# Altium PCB Control Board-v1.0.PcbDoc (part 8 of 8)
Units mil, origin at the board's own origin, x right, y up, seen from the top; angles counter-clockwise.
Board outline 7874.02 x 5118.11 mil, 4 copper layers (Top Layer, Layer 1, Layer 2, Bottom Layer), stack 61.654 mil thick; 475 components, 366 nets, 1579 pads, 587 vias.
Unrouted connection lines stored in the file: 427.
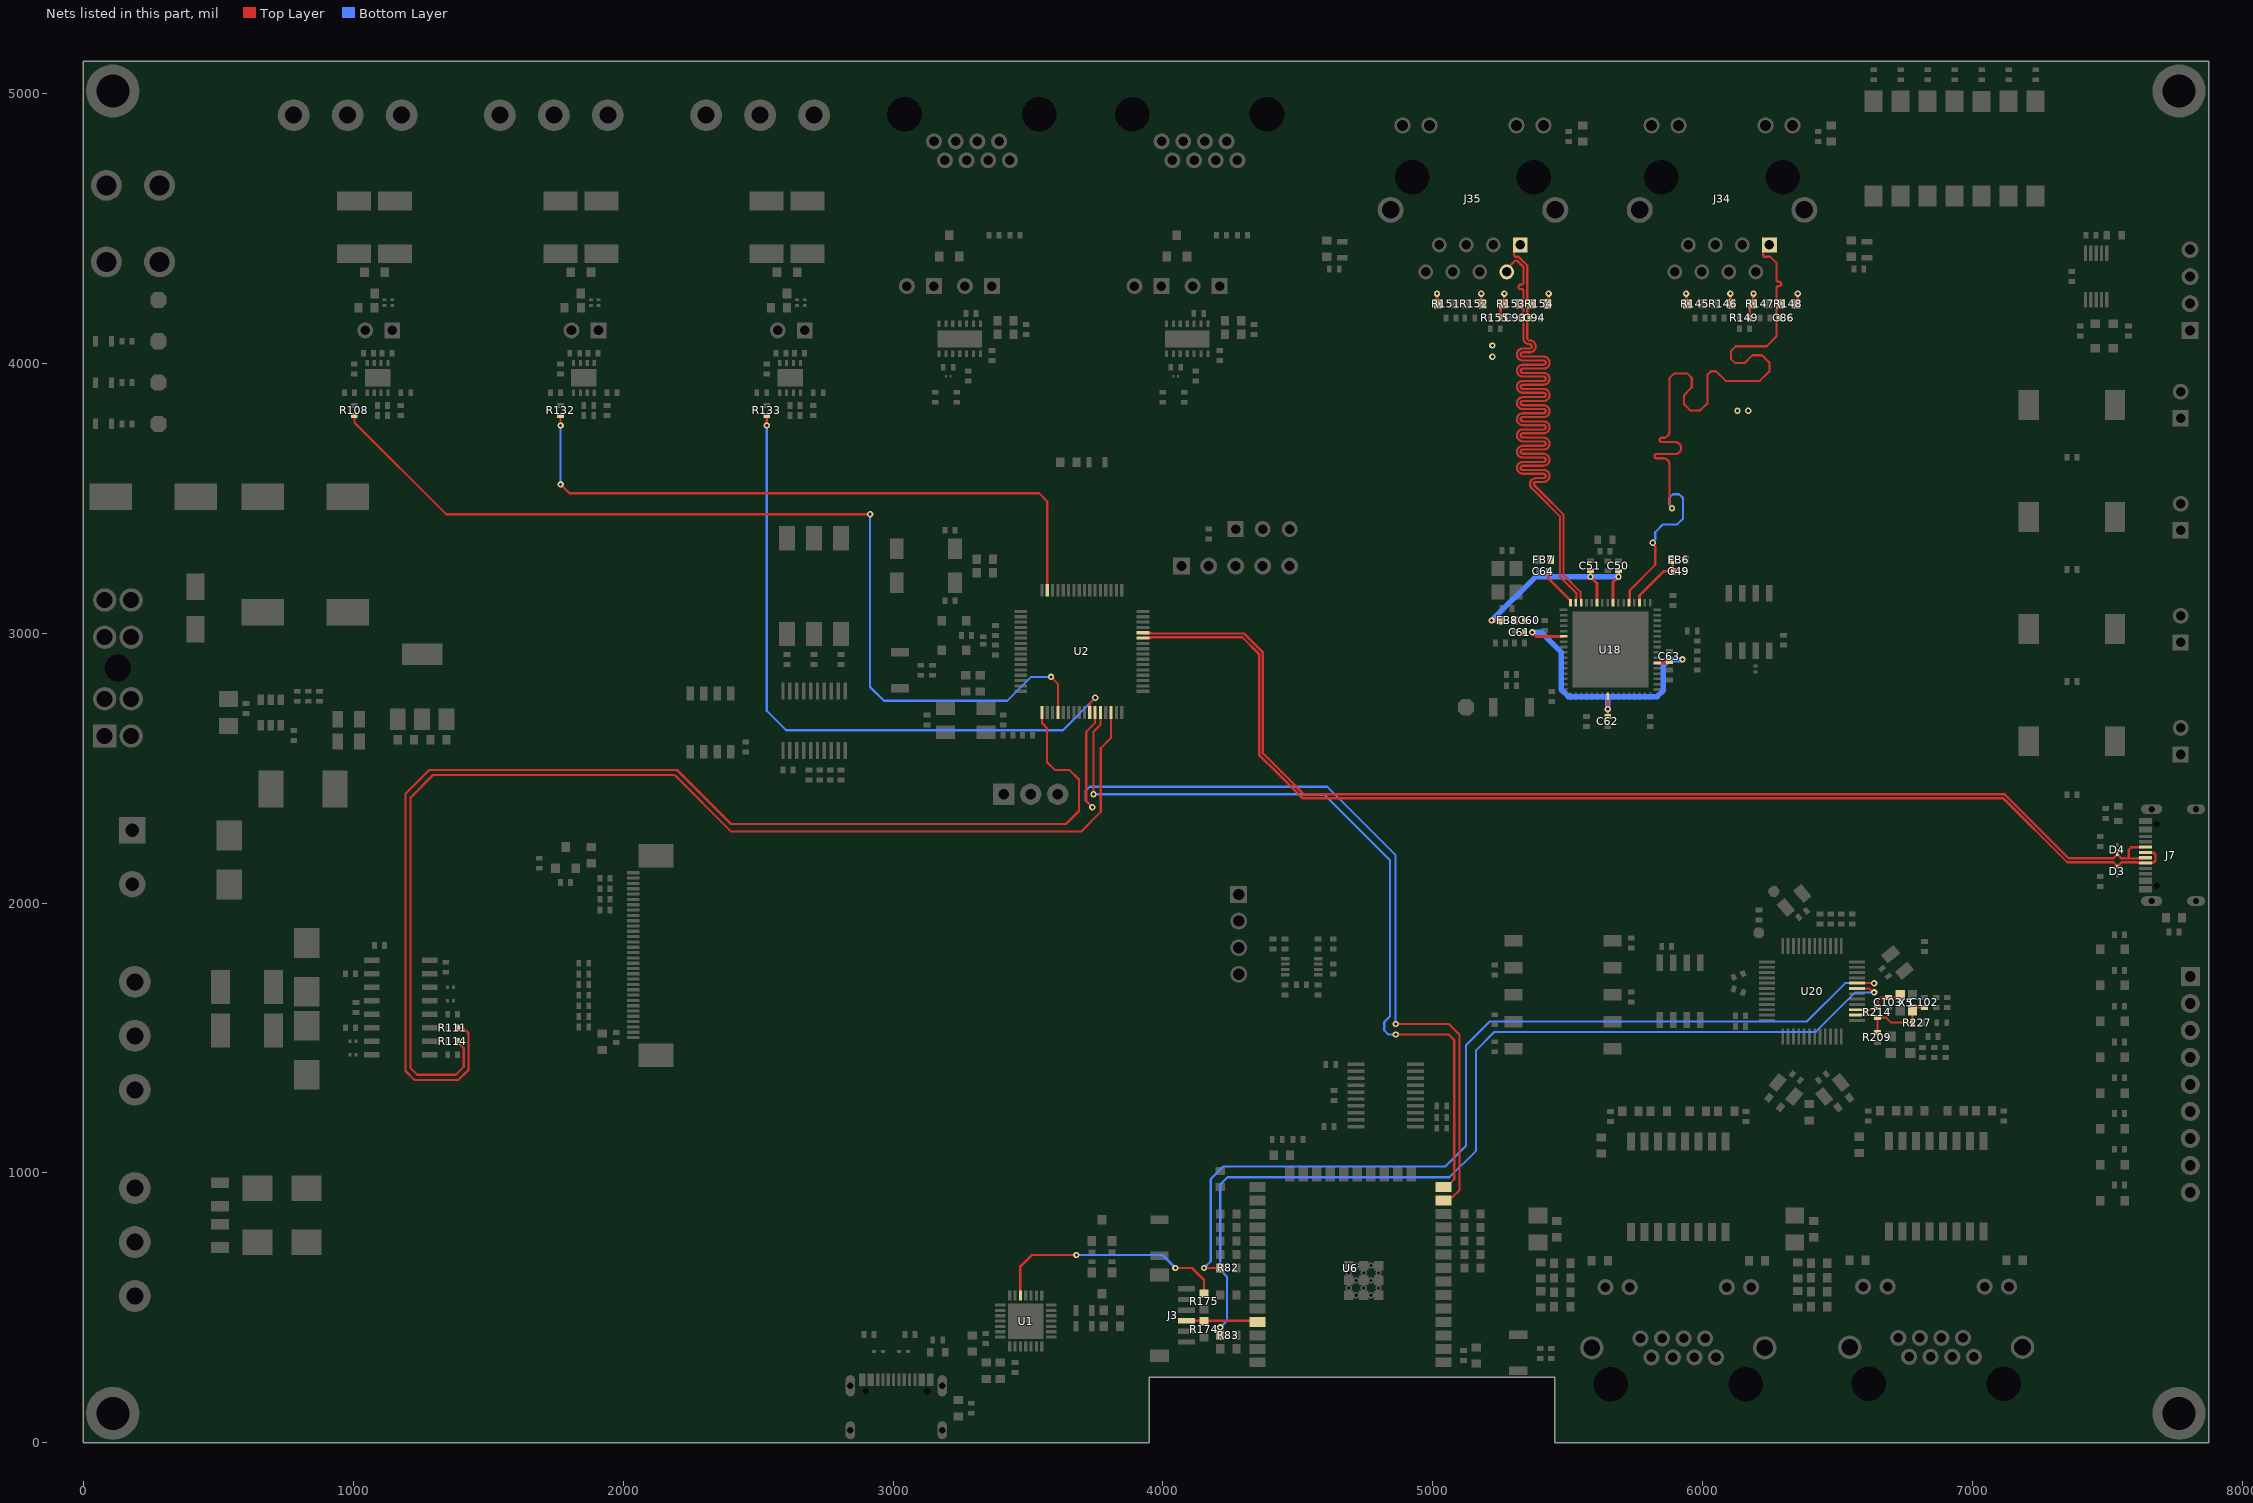
[diagram p7: the nets of this part, all layers, seen from the top]

## Via types
v1: diameter 23.62, hole 11.81, Top Layer to Bottom Layer, 587 vias

## Nets (pads, with @x,y where several pads share a name; then routed paths per layer and width w, separated by ;. In a path a pad name is that pad's centre, name@x,y a point inside that pad or via, vN(x,y) a via of type N, cw(c..) or ccw(c..) an arc to the next point about the centre after c; other vN are vias at no path point) (continued)
TXA_P: C86.2 J34.1 R148.1 U18.53 | length 2854.4
  Top Layer w8: U18.53@5726.17,3111.83 5727.09,3112.75 5727.09,3128.74 5729.01,3130.66 5729.01,3158.11 5823.88,3252.98 5823.89,3322.26 5814.07,3332.07 v1(5814.07,3334.76) ; v1(5885.81,3462.65) 5885.81,3465.33 5876,3475.14 5876,3614.65 5876,3625.65 ccw(c5854,3625.65) 5854,3647.65 5828.35,3647.65 cw(c5828.35,3655.65) 5828.35,3663.65 5897.69,3663.65 ccw(c5897.69,3685.65) 5897.69,3707.65 5847.52,3707.65 cw(c5847.52,3715.65) 5847.52,3723.65 5854,3723.65 ccw(c5854,3745.65) 5876,3745.65 5876,3775.55 5876,3898.75 5876,3943.79 5894.42,3962.21 5942.19,3962.21 5959.1,3945.31 5959.1,3910.49 5930.31,3881.71 5930.31,3848 5934.42,3843.9 5953.2,3825.11 5990.8,3825.11 6017.33,3851.64 6017.33,3957.42 6030,3970.09 6049.04,3970.09 6084.6,3934.54 6211.13,3934.54 6246.69,3970.09 6246.69,4002.15 6219.38,4029.45 6183.6,4029.45 6154.26,4000.11 6120.52,4000.11 6103.75,4016.88 6103.75,4044.54 6122.07,4062.86 6236.55,4062.86 6272.32,4098.63 6272.32,4154.65 6281.82,4164.15 C86.2@6281.82,4167.65 6281.82,4171.15 6272.32,4180.65 6272.32,4202.15 6287.32,4217.15 R148.1@6287.32,4219.65 6287.32,4222.15 6272.32,4237.15 6272.32,4257.65 6272.32,4277.65 cw(c6280.32,4277.65) 6280.32,4285.65 6282.78,4285.65 ccw(c6282.78,4293.65) 6282.78,4301.65 6280.32,4301.65 cw(c6280.32,4309.65) 6272.32,4309.65 6272.32,4338.19 6272.32,4372.48 6250.22,4394.58 6227.51,4394.58 6222.82,4399.26 6222.82,4414.67 J34.1@6246.34,4438.19
  Bottom Layer w8: v1(5814.07,3334.76) 5814.07,3337.44 5823.89,3347.25 5823.89,3374.11 5852.62,3402.85 5905.06,3402.85 5926.19,3423.97 5926.19,3500.35 5912.12,3514.41 5889.49,3514.41 5876,3500.93 5876,3475.14 5885.81,3465.33 v1(5885.81,3462.65)
TXB_N: C93.2 J35.2 R153.1 U18.63 | length 2974.7
  Top Layer w8: J35.2@5273.52,4338.19 5273.52,4349.41 5304.68,4380.58 5311.31,4380.58 5335.49,4356.39 5335.49,4318.73 5335.49,4298.73 cw(c5327.49,4298.73) 5327.49,4290.73 5324.73,4290.73 ccw(c5324.73,4282.73) 5324.73,4274.73 5327.49,4274.73 cw(c5327.49,4266.73) 5335.49,4266.73 5335.49,4247.4 5335.49,4237.15 5320.49,4222.15 R153.1@5320.49,4219.65 5320.49,4217.15 5335.49,4202.15 5335.49,4180.65 5325.99,4171.15 C93.2@5325.99,4167.65 5325.99,4164.15 5335.49,4154.65 5335.49,4154.41 5335.49,4092.29 ccw(c5357.49,4092.29) 5357.49,4070.29 5358.92,4070.29 cw(c5358.92,4062.29) 5366.92,4062.29 cw(c5358.92,4062.29) 5358.92,4054.29 5333.25,4054.29 ccw(c5333.25,4032.29) 5311.25,4032.29 ccw(c5333.25,4032.29) 5333.25,4010.29 5410.22,4010.29 cw(c5410.22,4002.29) 5418.22,4002.29 cw(c5410.22,4002.29) 5410.22,3994.29 5333.25,3994.29 ccw(c5333.25,3972.29) 5311.25,3972.29 ccw(c5333.25,3972.29) 5333.25,3950.29 5410.22,3950.29 cw(c5410.22,3942.29) 5418.22,3942.29 cw(c5410.22,3942.29) 5410.22,3934.29 5333.25,3934.29 ccw(c5333.25,3912.29) 5311.25,3912.29 ccw(c5333.25,3912.29) 5333.25,3890.29 5410.22,3890.29 cw(c5410.22,3882.29) 5418.22,3882.29 cw(c5410.22,3882.29) 5410.22,3874.29 5333.25,3874.29 ccw(c5333.25,3852.29) 5311.25,3852.29 ccw(c5333.25,3852.29) 5333.25,3830.29 5410.22,3830.29 cw(c5410.22,3822.29) 5418.22,3822.29 cw(c5410.22,3822.29) 5410.22,3814.29 5333.25,3814.29 ccw(c5333.25,3792.29) 5311.25,3792.29 ccw(c5333.25,3792.29) 5333.25,3770.29 5410.22,3770.29 cw(c5410.22,3762.3) 5418.22,3762.3 cw(c5410.22,3762.29) 5410.22,3754.3 5333.25,3754.3 ccw(c5333.25,3732.3) 5311.25,3732.3 ccw(c5333.25,3732.3) 5333.25,3710.3 5410.22,3710.3 cw(c5410.22,3702.3) 5418.22,3702.3 cw(c5410.22,3702.3) 5410.22,3694.3 5333.25,3694.3 ccw(c5333.25,3672.3) 5311.25,3672.3 ccw(c5333.25,3672.3) 5333.25,3650.3 5410.22,3650.3 cw(c5410.22,3642.3) 5418.22,3642.3 cw(c5410.22,3642.3) 5410.22,3634.3 5333.25,3634.3 ccw(c5333.25,3612.3) 5311.25,3612.3 ccw(c5333.25,3612.3) 5333.25,3590.3 5410.22,3590.3 cw(c5410.22,3582.3) 5418.22,3582.3 cw(c5410.22,3582.3) 5410.22,3574.3 5381.84,3574.3 ccw(c5381.84,3552.3) 5366.32,3536.7 5384.22,3518.8 5470.27,3432.75 5470.27,3209.72 5532.16,3147.83 5532.16,3130.66 5530.24,3128.74 5530.24,3112.75 U18.63@5529.32,3111.83
TXB_P: C94.2 J35.1 R154.1 U18.62 | length 2974.7
  Top Layer w8: J35.1@5323.52,4438.19 5300,4414.67 5300,4399.26 5304.68,4394.58 5317.11,4394.58 5349.49,4362.19 5349.49,4237.15 5364.49,4222.15 R154.1@5364.49,4219.65 5364.49,4217.15 5349.49,4202.15 5349.49,4180.65 5358.99,4171.15 C94.2@5358.99,4167.65 5358.99,4164.15 5349.49,4154.65 5349.49,4154.41 5349.49,4092.29 ccw(c5357.49,4092.29) 5357.49,4084.29 5358.92,4084.29 cw(c5358.92,4062.29) 5380.92,4062.29 cw(c5358.92,4062.29) 5358.92,4040.29 5333.25,4040.29 ccw(c5333.25,4032.29) 5325.25,4032.29 ccw(c5333.25,4032.29) 5333.25,4024.29 5410.22,4024.29 cw(c5410.22,4002.29) 5432.22,4002.29 cw(c5410.22,4002.29) 5410.22,3980.29 5333.25,3980.29 ccw(c5333.25,3972.29) 5325.25,3972.29 ccw(c5333.25,3972.29) 5333.25,3964.29 5410.22,3964.29 cw(c5410.22,3942.29) 5432.22,3942.29 cw(c5410.22,3942.29) 5410.22,3920.29 5333.25,3920.29 ccw(c5333.25,3912.29) 5325.25,3912.29 ccw(c5333.25,3912.29) 5333.25,3904.29 5410.22,3904.29 cw(c5410.22,3882.29) 5432.22,3882.29 cw(c5410.22,3882.29) 5410.22,3860.29 5333.25,3860.29 ccw(c5333.25,3852.29) 5325.25,3852.29 ccw(c5333.25,3852.29) 5333.25,3844.29 5410.22,3844.29 cw(c5410.22,3822.29) 5432.22,3822.29 cw(c5410.22,3822.29) 5410.22,3800.29 5333.25,3800.29 ccw(c5333.25,3792.29) 5325.25,3792.29 ccw(c5333.25,3792.29) 5333.25,3784.29 5410.22,3784.29 cw(c5410.22,3762.3) 5432.22,3762.3 cw(c5410.22,3762.29) 5410.22,3740.3 5333.25,3740.3 ccw(c5333.25,3732.3) 5325.25,3732.3 ccw(c5333.25,3732.3) 5333.25,3724.3 5410.22,3724.3 cw(c5410.22,3702.3) 5432.22,3702.3 cw(c5410.22,3702.3) 5410.22,3680.3 5333.25,3680.3 ccw(c5333.25,3672.3) 5325.25,3672.3 ccw(c5333.25,3672.3) 5333.25,3664.3 5410.22,3664.3 cw(c5410.22,3642.3) 5432.22,3642.3 cw(c5410.22,3642.3) 5410.22,3620.3 5333.25,3620.3 ccw(c5333.25,3612.3) 5325.25,3612.3 ccw(c5333.25,3612.3) 5333.25,3604.3 5410.22,3604.3 cw(c5410.22,3582.3) 5432.22,3582.3 cw(c5410.22,3582.3) 5410.22,3560.3 5381.84,3560.3 ccw(c5381.84,3552.3) 5376.18,3546.64 5404.02,3518.8 5484.27,3438.55 5484.27,3215.52 5546.16,3153.62 5546.16,3130.66 5548.08,3128.74 5548.08,3112.75 U18.62@5549.01,3111.83
TXD0: J3.3 R174.2 U6.35 | length 265.5
  Top Layer w10: J3.3@4086.23,452.64 4345.15,452.64 U6.35@4349.78,448
TXD/RS232: R114.2 U2.30 | length 4419.1
  Top Layer w8: R114.2@1387,1487.99 1387,1484.49 1409.68,1461.82 1409.68,1393.02 1380.4,1363.74 1237.33,1363.74 1212.67,1388.4 1212.67,2391.21 1295.83,2474.37 2191.01,2474.37 2400.91,2264.47 3696.12,2264.47 3769.39,2337.74 3769.39,2573.62 3807.54,2611.78 U2.30@3807.54,2706.04
TXD/RS232-2: R111.2 U2.17 | length 4562.1
  Top Layer w8: R111.2@1387,1537.99 1407.39,1537.99 1426.81,1518.57 1426.81,1381.36 1390.35,1344.89 1226.64,1344.89 1193.84,1377.69 1193.84,2405.36 1281.37,2492.89 2199.29,2492.89 2399.43,2292.75 3640.64,2292.75 3689.02,2341.14 3689.02,2457.5 3653.29,2493.24 3599.43,2493.24 3570.59,2522.08 3570.59,2647.75 3551.63,2666.71 U2.17@3551.63,2706.04
TXD/RS485: R108.1 U2.20 | length 3588.3
  Top Layer w8: R108.1@1004.2,3806.65 1004.2,3780.26 1344.09,3440.37 v1(2914.82,3440.37) ; v1(3585.1,2837.93) 3610.69,2812.34 U2.20@3610.69,2706.04
  Bottom Layer w8: v1(2914.82,3440.37) 2914.82,2800.61 2966.16,2749.27 3422.69,2749.27 3511.35,2837.93 v1(3585.1,2837.93)
TXD/RS485-2: R132.1 U2.63 | length 2413.9
  Top Layer w8: v1(1768.2,3551.11) 1801.4,3517.91 3541.19,3517.91 3571.32,3487.78 U2.63@3571.32,3158.79 ; v1(1768.2,3769.18) R132.1@1768.2,3806.65
  Bottom Layer w8: v1(1768.2,3551.11) v1(1768.2,3769.18)
TXD/RS485-3: R133.1 U2.26 | length 2453.2
  Top Layer w8: v1(2532.2,3769.18) R133.1@2532.2,3806.65 ; U2.26@3728.8,2706.04 3728.8,2739.86 v1(3749.34,2760.4)
  Bottom Layer w8: v1(2532.2,3769.18) 2532.2,2712.59 2604.43,2640.35 3629.3,2640.35 v1@3748.97,2760.03
TXD_0: R82.1 U20.20 | length 3439.2
  Top Layer w8: v1(4152,648) R82.1@4212,648 ; U20.20@6571.82,1703.21 v1(6634.54,1703.21)
  Bottom Layer w8: v1(4152,648) 4177.02,673.02 4177.02,977.97 4222.8,1023.74 5045.74,1023.74 5122.68,1100.68 5122.68,1473.18 5210.69,1561.19 6385.44,1561.19 6527.46,1703.21 v1(6634.54,1703.21)
TXD_1: R83.1 U20.19 | length 3583.8
  Top Layer w8: R83.1@4212,398 v1(4212,427.83) ; U20.19@6571.83,1683.52 6615.94,1683.52 6630.31,1669.16 v1(6634.54,1669.16)
  Bottom Layer w8: v1(4212,427.83) 4237,452.83 4237,616 4212,641 4212,957.3 4238.69,984 5061.01,984 5159.95,1082.94 5159.95,1454.59 5227.99,1522.62 6418.18,1522.62 6564.71,1669.16 v1(6634.54,1669.16)
TXD_CP2102: R175.1 U1.26 | length 893.2
  Top Layer w9: U1.26@3471.8,545.86 3471.8,653.81 3514.11,696.11 v1(3679.11,696.11) ; v1(4046,648) 4107,648 4152,603 R175.1@4152,554.01
  Bottom Layer w9: v1(3679.11,696.11) 3997.89,696.11 v1(4046,648)
USART5_RX: U2.28 U6.14 | length 3013.8
  Top Layer w8: v1(3742.35,2403.11) 3742.35,2634.37 3768.17,2660.19 U2.28@3768.17,2706.04 ; v1(4862,1513) 5058.45,1513 5079.11,1492.34 5079.11,976.54 5050.57,948 U6.14@5038.76,948 U6.14@5025.45,934.69
  Bottom Layer w8: v1(3742.35,2403.11) 4596.5,2403.11 4841,2158.61 4841,1580.79 4819.58,1559.37 4819.58,1528.52 4835.11,1513 v1(4862,1513)
USART5_TX: U2.27 U6.13 | length 3254.4
  Top Layer w8: v1(3738.39,2355.15) 3715.71,2377.82 3715.71,2634.8 3748.48,2667.57 U2.27@3748.48,2706.04 ; v1(4862,1552) 5058.45,1552 5098.47,1511.97 5098.47,936.29 5073.58,911.39 5052.15,911.39 U6.13@5038.76,898 U6.13@5025.46,911.3
  Bottom Layer w8: v1(3738.39,2355.15) 3712.37,2381.16 3712.37,2415.04 3728.28,2430.95 4608.66,2430.95 4862,2177.61 v1(4862,1552)
USB_N: D3.1 J7.A7 J7.B7 U2.43 | length 4396.7
  Top Layer w9: U2.43@3925.65,2981.63 3927.05,2983.03 3955.98,2983.03 3957.42,2984.47 3980.76,2984.47 4293.78,2984.47 4356.06,2922.2 4356.06,2548.95 4423.9,2481.12 4516.47,2388.54 7112.47,2388.54 7349.8,2151.21 7520.38,2151.21 7534.29,2137.3 7534.29,2135.52 D3.1@7535.11,2134.71 ; D3.1@7535.11,2136.48 7535.92,2137.3 7537.69,2137.3 7551.48,2151.09 7608.32,2151.09 7609.76,2149.65 7669.33,2149.65 7677,2157.32 7677,2179.93 7670.02,2186.91 7640.8,2186.91 J7.A7@7640.1,2187.61
USB_P: D4.1 J7.A6 J7.B6 U2.44 | length 4393.1
  Top Layer w9: U2.44@3925.65,3001.32 3927.05,2999.91 3955.98,2999.91 3957.42,2998.47 3986.55,2998.47 4299.58,2998.47 4370.06,2928 4370.06,2554.75 4437.9,2486.91 4522.27,2402.54 7118.27,2402.54 7355.6,2165.21 7520.38,2165.21 7534.29,2179.12 7534.29,2180.89 D4.1@7535.11,2181.71 ; D4.1@7535.11,2179.94 7535.92,2179.12 7537.69,2179.12 7551.61,2165.21 7562.88,2165.21 7563,2165.09 7577.94,2165.09 ; J7.A6@7640.1,2167.93 7638.69,2166.52 7609.76,2166.52 7608.32,2165.09 7577.94,2165.09 ; J7.B6@7640.1,2207.3 7587.99,2207.3 7577.94,2197.25 7577.94,2165.09
VDD12TX1: C50.2 C51.2 FB8.2 U18.56 U18.59 | length 823.2
  Top Layer w10: C51.2@5583.61,3230.83 v1(5583.61,3208.75) 5608.06,3184.3 U18.59@5608.06,3111.83 ; U18.56@5667.12,3111.83 5667.12,3188.38 v1(5687.49,3208.75) C50.2@5687.49,3230.83
  Top Layer w15: v1(5217.55,3046.87) FB8.2@5247.18,3046.87
  Bottom Layer w20: v1(5217.55,3046.87) 5379.43,3208.75 v1(5583.61,3208.75) v1(5687.49,3208.75)
VDD33TXRX1: C49.2 FB6.2 R145.2 R146.2 R147.2 R148.2 R149.2 U18.51 | length 429.1
  Top Layer w8: R149.2@6172.32,4167.65 6174.06,4169.39 6174.06,4210.39 R147.2@6183.32,4219.65
  Top Layer w10: U18.51@5765.54,3111.83 5765.54,3139.38 5855,3228.84 C49.2@5891.66,3228.84 5888.69,3231.81 5888.69,3265.63 FB6.2@5882.6,3271.72 ; R145.2@5938.12,4223.84 v1(5938.12,4257.65) ; R146.2@6102.15,4223.84 v1(6102.15,4257.65) ; R147.2@6187.52,4223.84 v1(6187.52,4257.65) ; R148.2@6351.52,4223.84 v1(6351.52,4257.65)
  other v1: 6128.17,3824.11 6168,3824.11
VDD33TXRX2: C64.2 FB7.2 R151.2 R152.2 R153.2 R154.2 R155.2 U18.64 | length 342.8
  Top Layer w8: R155.2@5249.49,4167.65 5251.23,4169.39 5251.23,4210.39 R153.2@5260.49,4219.65
  Top Layer w10: R151.2@5015.3,4223.84 v1(5015.3,4257.65) ; R152.2@5179.32,4223.84 v1(5179.32,4257.65) ; R153.2@5264.69,4223.84 v1(5264.69,4257.65) ; C64.2@5427.47,3228.84 5427.47,3202.7 5509.64,3120.53 U18.64@5509.64,3111.83 ; R154.2@5428.69,4223.84 v1(5428.69,4257.65)
  other v1: 5220.32,4023.65 5220.32,4065.65
VDDCR: C60.2 C61.2 C62.2 C63.2 FB8.1 U18.6 U18.24 U18.38 | length 1137.9
  Top Layer w10: v1(5368.05,3002.58) 5382.81,2987.81 U18.6@5484.05,2987.81 ; C62.2@5647.65,2691.69 5647.65,2718.56 U18.24@5647.65,2765.59 ; U18.38@5830.5,2889.39 5867.22,2889.39 5872.8,2894.97 C63.2@5876.3,2894.97
  Bottom Layer w20: v1(5368.05,3002.58) 5402.44,3002.58 5474.8,2930.22 5474.8,2791.83 5501.8,2764.83 5647.43,2764.83 ; v1(5647.43,2718.34) 5647.43,2764.83 ; v1(5924.8,2902.62) 5924.11,2901.93 5875.73,2901.93 5853.94,2880.14 5853.94,2788.14 5830.63,2764.83 5647.43,2764.83
X1: C102.2 R209.1 R214.1 R227.1 U20.14 X5.1 | length 366.4
  Top Layer w7: U20.14@6571.82,1585.1 6634.72,1585.1 6643.54,1576.28 R214.1@6647.04,1576.28 ; R209.1@6647.04,1521 R214.1@6647.04,1576.28 ; C102.2@6821.1,1613.28 6787,1613.28 X5.1@6776.63,1602.92 R227.1@6776.63,1557 6697.24,1557 6677.96,1576.28 R214.1@6647.04,1576.28
X2: C103.2 R214.2 U20.15 X5.3 | length 198
  Top Layer w7: U20.15@6571.83,1604.78 6635.03,1604.78 6643.54,1613.28 R214.2@6647.04,1613.28 6647.04,1639.95 6657.37,1650.28 C103.2@6687.53,1650.28 6721.64,1650.28 X5.3@6731.36,1660
pads on no net: J1.A8 J1.B8 J1.MH J3.MP1 J3.MP2 J7.A8 J7.B8 J7.MH J8.MH J14. J16.MH J18. J18.1 J18.2 J18.3 J18.6 J22. J22.1 J22.2 J22.3 J22.6 J24.11 J24.12 J24.13 J24.14 J24.15 J24.16 J24.17 J24.18 J24.19 J24.20 J24.21 J24.22 J24.23 J24.24 J24.25 J24.26 J24.MP1 J24.MP2 J34.7 J34.11 J34.12 J34.MH1 J34.MH2 J35.7 J35.11 J35.12 J35.MH1 J35.MH2 T1.4 T1.5 T1.12 T1.13 T2.4 T2.5 T2.12 T2.13 U1.1 U1.2 U1.10 U1.11 U1.12 U1.13 U1.14 U1.15 U1.16 U1.17 U1.20 U1.21 U1.22 U1.23 U1.27 U2.54 U2.56 U3.3 U3.8 U3.13 U3.14 U3.18 U4.6 U4.7 U6.4 U6.5 U6.6 U6.7 U6.17 U6.18 U6.19 U6.20 U6.21 U6.22 U6.32 U11.3 U11.8 U11.13 U11.16 U11.17 U11.18 U18.3 U18.12 U18.15 U18.16 U18.21 U18.22 U18.23 U18.25 U18.26 U18.27 U18.28 U18.29 U18.30 U18.31 U18.33 U18.35 U18.36 U18.39 U18.40 U18.49 U20.13 U20.24 U20.30 U20.33 U20.34

## Polygon pours and split planes (outlines as drawn)
+3V3-A on Top Layer "NONET_L-01_P-001" (solid, pour order 13): 6256.58,1101.21 6358.45,1101.21 6358.45,1278.75 6375.54,1295.84 6375.54,1346.58 6380.29,1351.32 6380.29,1535.89 6360.61,1535.89 6360.61,1367.23 6357.17,1363.8 6256.58,1246.35
+1.8V on Top Layer "NONET_L-01_P-001" (solid, pour order 10): 6521.01,1280.19 6542.13,1297.92 6570.91,1321.98 6605.05,1282.15 6594.07,1236.37 6559.25,1234.61
+3V3 on Top Layer "NONET_L-01_P-001" (solid, pour order 4): 6267.82,1280.66 6246.69,1298.39 6217.92,1322.45 6183.78,1282.62 6194.76,1236.84 6229.57,1235.08
+3V3 on Top Layer "NONET_L-01_P-001" (solid, pour order 25): 6706.06,1844.63 6761.11,1844.63 6777.69,1828.05 6667.54,1737.27 6542.29,1737.27 6542.29,1747.9 6603.1,1747.89 6629.2,1762.27 6660.09,1806.06
+1.8V-A on Top Layer "NONET_L-01_P-001" (solid, pour order 3): 6407,1535.89 6407,1302.29 6415.22,1294.07 6486.01,1209.71 6520.16,1238.36 6436.18,1348.82 6422,1386.7 6422,1535.89
+1.8V on Top Layer "NONET_L-01_P-001" (solid, pour order 1): 6256.09,1979.86 6278.43,1954.16 6298,1953.23 6349.98,1885.97 6349.98,1811.47 6382,1811.47 6382,1931.91 6370.41,1943.5 6303.77,2019.88
+1.8V on Top Layer "NONET_L-01_P-001" (solid, pour order 0): 6303.48,1690.77 6349.98,1737.27 6349.98,1841 6382,1841 6382,1665.48 6270.39,1665.48 6258.87,1677 6180,1677 6155.83,1652.83 6136.44,1659.89 6147.68,1690.77
+3V3 on Top Layer "NONET_L-01_P-001" (solid, pour order 24): 6165.83,1760.58 6183.84,1728.21 6266.71,1728.21 6266.71,1715.65 6195.1,1715.65 6143.05,1715.65 6131.27,1748
NetFB1_1 on Top Layer "NETFB1_1_L01_P014" (solid, pour order 14): 3149.63,351.64 3149.63,299.96 3118.14,268.46 3118.14,245.84 3118.14,140.04 3096.94,118.84 2925.62,118.84 2905.54,138.92 2905.54,301.71 2929.16,301.71 2929.16,191.78 2948.85,172.09 3081.45,172.09 3094.52,185.15 3094.52,351.64
NetFB2_1 on Top Layer "NETFB2_1_L01_P017" (solid, pour order 17): 7522.36,2315.57 7574.04,2315.57 7605.54,2284.07 7628.16,2284.07 7733.96,2284.07 7755.16,2262.87 7755.16,2091.55 7735.08,2071.47 7572.29,2071.47 7572.29,2095.09 7682.22,2095.09 7701.91,2114.78 7701.91,2247.39 7688.85,2260.45 7522.36,2260.45
GND on Top Layer "GND_L01_P026" (solid, remove dead copper, pour order 26): 0,0 0,5118.11 7874.02,5118.11 7874.02,0
+3V3 on Top Layer "+3V3_L01_P022" (solid, pour order 22): 2061.1,1546.96 1919.48,1546.96 1887.98,1515.47 1844.47,1515.47 1844.47,1486.31 1924.33,1486.31 1939.33,1486.31 1939.33,1501.31 1986.97,1501.31 2001.13,1515.47 2061.1,1515.47
VDD33TXRX1 on Top Layer "VDD33TXRX1_L01_P021" (solid, pour order 21): 6188,3849.11 6085,3849.11 5975,3739.11 5975,3451.04 5870.79,3346.83 5870.79,3216.34 5900.66,3216.34 5900.66,3319.65 6025,3444 6025,3719.11 6105,3799.11 6188,3799.11
VDD33TXRX2 on Top Layer "VDD33TXRX2_L01_P020" (solid, pour order 20): 5448.34,3216.34 5448.34,3349.45 5245,3552.78 5245,4084.29 5195,4084.29 5195,3524.78 5418.47,3301.32 5418.47,3216.34
NetC17_1 on Top Layer "NETC17_1_L01_P019" (solid, pour order 19): 767,2334.11 792.56,2359.67 792.56,2611.57 727.54,2611.57 706.61,2632.5 706.61,2678.59 682.99,2678.59 682.99,2601.1 638,2556.11 638,2348.11 652,2334.11
GND on Layer 1 "GND_L02_P012" (solid, pour order 12): 0,0 0,5118.11 7874.02,5118.11 7874.02,0
"CHASIS GND" on Layer 1 "CHASIS_GND_L02_P009" (solid, pour order 9): 3736,461 3736,366 3700,330 3423.9,330 3380,373.9 3380,461 0,461 0,11.01 0,0 3948.53,0 3948.53,244.11 5451.93,244.11 5451.93,0 6747,0 7874.02,0 7874.01,5118.11 0,5118.11 0,4289.11 380,4289.11 380,4713.11 4764,4713.11 4764,4289.11 6481,4289.11 6481,4713.11 7490,4713.11 7490,461
+1.8V on Layer 2 "NONET_L-01_P-001" (solid, pour order 8): 6260,1769.02 6260,1433 6548,1433 6548,1230 6674,1230 6674,1555 6409,1555 6409,1769.02
+5V on Layer 2 "+5V_L03_P005" (solid, pour order 5): 4575,1685 4575,1815 4437,1815 4437,1685 4172,1685 4172,2479.11 6650,2479.11 6650,4028.73 4089.28,4028.73 4089.28,3899.11 3948.53,3899.11 3948.53,4028.73 3246.73,4028.73 3246.73,3899.11 3107,3899.11 3107,4543.11 884,4543.11 884,3682.11 1133,3682.11 1133,2479.11 0,2479.11 0,4889.37 232.74,4889.37 232.81,4889.45 232.81,5118.11 6852.36,5118.11 7081,5118.11 7081,2169 4679,2169 4679,1685
+3V3 on Layer 2 "+3V3_L03_P027" (solid, remove dead copper, pour order 27): 0,0 3948.53,0 3948.53,244.11 5451.93,244.11 5451.93,0 7874.02,0 7874.02,5118.11 0,5118.11
+3V3-A on Bottom Layer "+3V3-A_L04_P029" (solid, pour order 29): 5571,1116.83 5571,1190 7015,1190 7015,1119 6523.95,1119 6523.95,1018 6245.37,1018 6245.37,1116.83 5663.21,1116.83
GND on Bottom Layer "GND_L04_P011" (solid, remove dead copper, pour order 11): 0,0 0,5118.11 7874.02,5118.11 7874.02,0

## Other copper
Top Layer:
  region net GND: 6674.87,1688.76 6822.67,1815.18 6804.05,1836.95 6656.25,1710.52
  rectangle net +3V3: 4433,1111.63 4491.07,1169.3
  rectangle net +3V3: 6748.73,1419 6788.1,1462.2
  rectangle net +3V3: 6748.73,1419 6966.64,1437
  rectangle net +3V3: 3244.33,362.59 3311.49,417.91
  rectangle net +3V3: 3276.49,384.51 3415.7,417.91
  rectangle net ESPUSB_N: 3017.01,274.57 3047.29,283.57
  region net +1.8V-A: 6421.31,1535.89 6409.03,1535.89 6409.03,1407.44 6421.31,1407.44
  rectangle net +3V3: 4588,1293.39 4646.5,1314.4
  rectangle net +3V3: 4588,1288.94 4746.49,1308.83
  rectangle net +3V3: 6542.29,1737.27 6635.03,1747.9
  rectangle net +3V3: 5823.69,1748.79 5856.54,1905
  rectangle net +3V3-A: 6368,1407.44 6380.29,1535.89
  rectangle net +1.8V: 6368,1724.6 6382,1898
  rectangle net +3V3: 6153.3,1715.65 6266.71,1728.21
  rectangle net +1.8V: 6163.63,1677 6330.29,1690.77
  region net NetC1_2: 3164.4,118.96 3164.4,13.43 3302.34,13.43 3302.34,118.96
  rectangle net NetFB1_1: 2905.54,210.28 2929.16,299.84
  rectangle net NetFB1_1: 3094.52,210.28 3118.14,351.64
  region net +5V: 3106.29,393.9 3106.29,368.9 3155.88,368.9 3155.88,393.9
  rectangle net NetFB1_1: 3094.52,320.15 3149.63,351.64
  region net NetFB1_2: 3174.88,393.9 3174.88,320.15 3204.75,320.15 3204.75,393.9
  region net NetC15_1: 7448.1,4490.15 7448.1,4458.65 7508.28,4458.65 7508.28,4490.15
  region net NetC15_1: 7451.19,4490.15 7451.19,4379.4 7463,4379.4 7463,4490.15
  rectangle net +3V3: 5009.23,330.18 5255,369
  rectangle net GND: 2072.32,1495.94 2084.92,1585
  rectangle net GND: 1844.47,1418.93 2047.51,1475.95
  rectangle net GND: 1961.97,1418.93 2047.51,1491.81
  region net GND: 2047.51,1507.99 2008.43,1507.99 2008.43,1418.93 2047.51,1418.93
  region net GND: 2061.49,1495.39 2061.49,1507.99 2008.43,1507.99 2008.43,1495.39
  region net GND: 2013.46,1507.99 2013.46,1495.39 2102.52,1495.39 2102.52,1507.99
  rectangle net +3V3: 5925.91,3255.97 5974.56,3287.47
  rectangle net +5V: 4558.73,1767.8 4642.96,1779.61
  rectangle net +3V3: 2384.3,2496.74 2466.58,2569.18
  rectangle net +3V3: 2620.19,2444.16 2638.19,2505.18
  rectangle net +5V: 4020.94,3912.67 4074.81,3936.37
  rectangle net +5V: 4056.81,3972.15 4070.12,4047.22
  rectangle net +5V: 4051.24,3912.67 4074.81,3997.15
  rectangle net +5V: 3177.87,3912.67 3231.73,3936.37
  rectangle net +5V: 3213.73,3972.15 3227.04,4047.22
  rectangle net +5V: 3208.17,3912.67 3231.73,3997.15
  rectangle net GND: 1365.31,1725.11 1391,1784.07
  rectangle net GND: 1254.5,1725.11 1391,1752.61
  rectangle net +3V3: 1254.5,1771.61 1355.5,1830.61
  region net VDD33TXRX1: 5900.66,3287.47 5870.79,3287.47 5870.79,3216.34 5900.66,3216.34
  rectangle net +3V3: 2676.06,2483.68 2706.53,2525.61
  rectangle net +3V3: 2484.32,3957.99 2507.74,4012.46
  rectangle net +3V3: 5427.97,2774.33 5452.97,2822.25
  rectangle net +5V: 4617.96,1764.7 4642.96,1839.05
  rectangle net +3V3: 4482.53,1684.36 4506.89,1766.47
  rectangle net +3V3: 4436.68,1748.11 4506.89,1759.92
  rectangle net +3V3: 1904.33,1501.31 1986.97,1531.81
  rectangle net VDD33TXRX2: 5418.47,3216.34 5448.34,3287.47
  rectangle net NetFB2_2: 7480.1,2340.81 7553.85,2370.68
  region net NetFB2_1: 7553.85,2260.45 7553.85,2315.57 7522.36,2315.57 7522.36,2260.45
  region net NetFB2_1: 7663.72,2071.47 7663.72,2095.09 7574.16,2095.09 7574.16,2071.47
  region net NetFB2_1: 7663.72,2260.45 7663.72,2284.07 7522.36,2284.07 7522.36,2260.45
  rectangle net NetC8_2: 7755.04,1880.61 7860.57,2025.21
  rectangle net +3V3: 1316.58,2576.11 1433,2779.11
  rectangle net +5V: 988,2568.15 1194.53,2730.11
  rectangle net +5V: 988,2334.11 1078,2711.15
  rectangle net +5V: 876,2334.11 1078,2544.11
  rectangle net +24V: 502,2726.15 706.61,2903.11
  rectangle net +24V: 502,2861.11 768,3655.11
  rectangle net +24V: 275,3407.11 768,3655.11
  rectangle net +24V: 275,3122.86 768,3655.11
  rectangle net NetD17_2: 15,2932.11 247,3266.11
  rectangle net NetD17_2: 15,2932.11 471,3098.11
  rectangle net NetD19_2: 15,2189.11 249,2803.11
  rectangle net NetD19_2: 15,2189.11 591,2479.11
  rectangle net NetC12_2: 3366.77,2956.04 3496.52,2967.85
  rectangle net NetC12_2: 3256.03,2947.04 3391.77,2967.85
  rectangle net +3V3: 3322.46,2975.72 3391.77,3000.42
  rectangle net +3V3: 3366.77,2975.72 3537.27,2987.53
  rectangle net +3V3: 3281.27,2975.72 3346.27,3076.68
  rectangle net +3V3: 3256.03,3028.88 3346.27,3076.68
  rectangle net NetC12_2: 3256.03,2918.64 3346.09,2967.85
  rectangle net +3V3: 3449.28,2936.35 3537.27,2948.16
  rectangle net +3V3: 3508.83,2936.35 3537.27,2987.53
  rectangle net GND: 3366.77,2916.67 3496.52,2928.48
  rectangle net GND: 3358.2,2910.04 3391.77,2936.15
  rectangle net GND: 3358.2,2916.51 3439.24,2936.15
  rectangle net +3V3: 5401.8,3000.87 5458.03,3027.34
  rectangle net VDD33TXRX2: 5500.8,3098.05 5514.56,3128.66
  rectangle net +3V3: 5330.3,2950.71 5368.44,2980.13
  rectangle net VDDCR: 5327.3,2990.08 5380.36,3015.08
  rectangle net VDDCR: 5327.3,2990.08 5348.3,3062.63
  rectangle net VDDCR: 5290.49,3031.12 5348.3,3062.62
  rectangle net +3V3: 6233.6,2862.83 6311.3,2965.43
  rectangle net VDDCR: 5911.71,2885.97 5936.82,2914.83
  rectangle net VDDCR: 5863.8,2885.97 5936.82,2903.97
  rectangle net RE/DE/RS485/T-3: 2599.81,3878.59 2637.22,3902.22
  rectangle net RE/DE/RS485/T-2: 1835.81,3878.59 1873.22,3902.22
  rectangle net RE/DE/RS485/T: 1071.81,3878.59 1109.22,3902.22
  rectangle net +3V3: 913.16,3988.83 1058.02,4012.46
  rectangle net +3V3: 1677.16,3988.83 1822.02,4012.46
  rectangle net +3V3: 2485,3988.83 2586.02,4012.46
  region net "CHASIS GND": 7871.47,52.11 7871.47,182.28 ccw(c7866.45,182.29) 7868.71,186.76 ccw(c7864.32,184.57) 7868.24,187.51 ccw(c7762.45,108.44) 7630.37,108.44 ccw(c7762.45,108.44) 7682.53,3.28 ccw(c7685.56,7.27) 7685.57,2.26 7871.47,2.26
  region net "CHASIS GND": 7871.47,5066.01 7871.47,4935.83 cw(c7866.46,4935.83) 7868.71,4931.35 cw(c7864.32,4933.55) 7868.24,4930.6 cw(c7762.45,5009.68) 7630.37,5009.68 cw(c7762.45,5009.68) 7682.53,5114.83 cw(c7685.57,5110.85) 7685.57,5115.85 7871.47,5115.85
  region net "CHASIS GND": 2.15,52.1 2.15,182.28 cw(c7.16,182.28) 4.91,186.76 cw(c9.3,184.56) 5.37,187.51 cw(c111.16,108.44) 243.24,108.44 cw(c111.16,108.44) 191.08,3.28 cw(c188.05,7.26) 188.05,2.26 2.15,2.26
  region net "CHASIS GND": 2.15,5066.01 2.15,4935.83 ccw(c7.16,4935.83) 4.91,4931.35 ccw(c9.3,4933.55) 5.38,4930.6 ccw(c111.17,5009.67) 243.24,5009.68 ccw(c111.17,5009.68) 191.08,5114.83 ccw(c188.05,5110.85) 188.05,5115.85 2.15,5115.85
  pour cut-out: 3029,466 2955.75,466 2955.75,333.58 3029,333.58
  pour cut-out: 3415.7,465.15 3414.85,466 2955.75,466 2955.75,417.91 3415.7,417.91
  pour cut-out: 244.88,3249.9 244.88,3269.99 250.88,3275.98 275.88,3275.98 275.88,3249.9
  pour cut-out: 471,2921.91 471,2942 477,2948 502,2948 502,2921.92
  pour cut-out: 961,2293 669,2293 669,2324.69 961,2324.69
  pour cut-out: 811.4,2551 872.1,2551 872.1,2291 811.4,2291
  pour cut-out: 5548.45,3484.38 5957.49,3484.38 5957.49,3536.27 5548.45,3536.27
  pour cut-out: 5525.53,3320.88 5602.24,3320.88 5635.62,3354.27 5635.62,3372.77 5535.72,3372.77 5525.53,3362.58
  pour cut-out: 5925.91,3245.78 6002.62,3245.78 6036,3279.16 6036,3297.67 5936.1,3297.67 5925.91,3287.47
  pour cut-out: 6477.55,4879.09 6458.82,4860.36 6458.82,4836.1 6477.55,4836.1
  pour cut-out: 6404.82,4939.39 6386.09,4920.66 6386.09,4896.4 6404.82,4896.4
  pour cut-out: 6404.82,4840.1 6386.09,4821.37 6386.09,4797.11 6404.82,4797.11
  pour cut-out: 6386.09,5118.21 6386.09,4097.65 4833.46,4097.65 4833.46,5118.21
Layer 2:
  pour cut-out: 0,2479.71 295.4,2479.71 296,2479.11 296,3204.11 0,3204.11 0,2479.11
  pour cut-out: 4833.79,5118.21 4833.79,4276.12 4833.32,4275.65 6386.32,4275.65 6386.32,5118.21 4833.66,5118.21
Bottom Layer:
  rectangle net +1.8V: 6293.21,1663.04 6375,1700.34
  rectangle net +1.8V: 6256.66,1906.71 6320.83,1990.67
  rectangle net +1.8V: 6256.66,1906.71 6375,1964
  rectangle net +1.8V: 6322.55,1663.04 6375,1964
  rectangle net +5V: 3284.04,194 3364.2,226.74
  rectangle net +5V: 3284.04,194 3317.67,471
  rectangle net +5V: 3100.22,435.46 3317.67,471
  rectangle net +5V: 3100.22,361.29 3135.69,471
  region net NetFB1_1: 2948.25,307.41 2920.88,307.41 2920.88,118.84 2948.25,118.84
  rectangle net NetFB1_1: 2894.95,237.92 2936.64,307.41
  rectangle net NetFB1_1: 3083.92,237.92 3125.62,307.41
  rectangle net NetFB1_1: 2920.88,118.84 3103,160.55
  rectangle net NetFB1_1: 3075.63,118.84 3103,307.41
  rectangle net VDD33TXRX2: 4995.17,4227.11 5455.17,4276.11
  rectangle net VDD33TXRX2: 5195,4005.11 5245,4275.11
  rectangle net VDD33TXRX1: 5918,4227.11 6378,4276.11
  rectangle net VDD33TXRX1: 6105,3799.11 6188,4276.11
  region net NetFB2_1: 7755.16,2142.87 7755.16,2213.78 7572.29,2213.78 7572.29,2142.87
  region net NetFB2_1: 7623.17,2063.99 7623.17,2291.55 7572.29,2291.55 7572.29,2063.99
  rectangle net NetD17_2: 15,2932.11 247,3266.11
  rectangle net NetD17_2: 15,2932.11 471,3098.11
  rectangle net NetD19_2: 15,2189.11 249,2803.11
  rectangle net NetD19_2: 15,2189.11 591,2479.11
  pour cut-out: 4833.79,5118.21 4833.79,4276.12 4833.32,4275.65 6386.32,4275.65 6386.32,5118.21 4833.66,5118.21
Multi-Layer:
  pour cut-out: 5569.72,1127.96 5569.72,286.96 6245.37,286.96 6245.37,1127.96
  pour cut-out: 6523.95,1130 6523.95,289 7200.16,289 7200.16,1130

## Silkscreen, mask and mechanical layers (free items; w line width, h text height)
Top Overlay:
  text "CHASIS GND" at 19.01,4735.9 h60
  text "RS-485 (01)" at 1355.54,4715.73 h60 r90
  text "RS-485 (02)" at 2119.54,4715.73 h60 r90
  text "RS-485 (03)" at 2883.54,4715.73 h60 r90
  text "CAN OUT" at 3730.03,4665.65 h60 r90
  text "CAN IN" at 4573.03,4665.65 h60 r90
  text "ETHERCAT OUT" at 4820.04,4665.65 h60 r90
  text "ETHERCAT IN" at 5742.86,4665.65 h60 r90
  text "B" at 963.51,4664.75 h59.06
  text "A" at 1160.37,4664.75 h59.06
  text "B" at 1727.51,4664.75 h59.06
  text "A" at 1924.37,4664.75 h59.06
  text "B" at 2491.51,4664.75 h59.06
  text "A" at 2688.37,4664.75 h59.06
  text "F" at 6745.97,4551.45 h59.06 r180
  text "G" at 6650.66,4551.25 h59.06 r180
  text "E" at 6847.36,4551.25 h59.06 r180
  text "D" at 6948.81,4551.25 h59.06 r180
  text "C" at 7049.43,4551.27 h59.06 r180
  text "B" at 7148.81,4551.25 h59.06 r180
  text "A" at 7251.95,4551.25 h59.06 r180
  text "ANALOG" at 7839.86,4475.46 h60 r90
  text "GND" at 7604.23,4390.58 h60
  text "A2" at 7604.23,4290.58 h60
  text "GND" at 319.01,4204.09 h60
  text "A1" at 7604.23,4190.58 h60
  text "+3V3" at 5.78,4111.24 h60
  text "+3V3" at 7604.23,4090.58 h60
  text "+5V" at 5.78,3958.24 h60
  text "GND" at 7630.07,3850.38 h39.37 r90
  text "+24V" at 5.78,3805.24 h60
  text "STOP" at 7630.07,3695.95 h39.37 r90
  text "GND" at 7628.07,3435.15 h39.37 r90
  text "PAUSE" at 7628.07,3280.41 h39.37 r90
  text "GND" at 4481.87,3109.32 h39.37 r90
  text "+3V3" at 4081.7,3103.86 h39.37 r90
  text "NRST" at 4381.87,3091.59 h39.37 r90
  text "GND" at 7628.07,3019.91 h39.37 r90
  text "SW-CLK/BOOT0" at 4192.34,2904.22 h39.37 r90
  text "SW-DIO" at 4292.34,2904.27 h39.37 r90
  text "START" at 7628.07,2865.18 h39.37 r90
  text "WAIT-ACK" at 4793.65,2702.26 h39.37
  text "GND" at 7628.07,2604.68 h39.37 r90
  text "EMERG" at 7617.6,2459.94 h39.37 r90
  text "SCL" at 3307.91,2243.5 h59.06
  text "SDA" at 3445.25,2243.5 h59.06
  text "GND" at 3580.93,2243.51 h59.06
  text "+24V" at 435.23,2208.58 h59.06 r90
  text "STM PROG" at 7449.27,2047.8 h39.37 r90
  text "GND" at 435.12,2013.82 h59.06 r90
  text "H" at 5145.76,1831.11 h59.06
  text "RS-232 (01)" at 1.89,1813.89 h60
  text "I" at 5145.76,1731.11 h59.06
  text "PC9" at 7593.94,1693.31 h60
  text "TX" at 444.89,1675.02 h59.06 r90
  text "OLED" at 4132.07,1639.11 h39.37 r90
  text "J" at 5145.76,1630.75 h59.06
  text "PC8" at 7593.89,1593.31 h60
  text "K" at 5145.76,1531.11 h59.06
  text "PC7" at 7593.89,1493.34 h60
  text "RX" at 444.89,1473.44 h59.06 r90
  text "L" at 5145.76,1431.24 h59.06
  text "PC6" at 7593.64,1393.31 h60
  text "TFT LCD" at 2324.57,1381.04 h59.06 r90
  text "PA8" at 7593.89,1293.56 h60
  text "PB15" at 7603.53,1204.29 h60
  text "PB14" at 7603.33,1103.92 h60
  text "RS-232 (02)" at 1.89,1049.89 h60
  text "PD8" at 7593.89,993.56 h60
  text "TX" at 444.89,911.02 h59.06 r90
  text "GND" at 7593.89,893.31 h60
  text "IO0" at 4009.89,850.53 h39.37 r90
  text "RX" at 444.89,709.44 h59.06 r90
  text "DIGITAL" at 7840.86,510 h60 r90
  text "ESP PROG" at 2887.83,425.27 h39.37
  text "RESET" at 5339.3,424.39 h39.37 r90
  text "VOLTLINK" at 3936.42,299.11 h39.37 r90
  text "INTERNET" at 7344.62,7.58 h60 r90
  text "LAN" at 6389.54,5.54 h60 r90
Bottom Overlay:
  text "REV-v1.0" at 950.81,66.89 h78.74
  text "CONTROL BOARD" at 2717.47,66.89 h78.74
Dimension:
  lines w5: 491.92,56.22 491.92,2231.82 3819.47,2231.82 3819.47,56.22 491.92,56.22 ; 2047.82,1689.32 3819.47,1689.32 3819.47,2074.32 2047.82,2074.32 2047.82,1689.32
Board Outline:
  the board outline again, w5
Fabrication:
  drawing of 295 lines, arcs and shapes, not listed
  text "Layer" at 8516.57,5254.35 h60
  text "Name" at 8926.48,5254.35 h60
  text "Material" at 9856.22,5254.35 h60
  text "Thickness" at 10715.99,5254.35 h60
  text "Constant" at 11365.83,5254.35 h60
  text "Board Layer Stack" at 11935.69,5254.35 h60
  text "Top Overlay" at 8926.48,5134.35 h60
  text "Top Solder" at 8926.48,5014.35 h60
  text "Solder Resist" at 9856.22,5014.35 h60
  text "0.020mm" at 10715.99,5014.35 h60
  text "3.5" at 11365.83,5014.35 h60
  text "1" at 8516.57,4894.35 h60
  text "Top Layer" at 8926.48,4894.35 h60
  text "0.035mm" at 10715.99,4894.35 h60
  text "Dielectric 2" at 8926.48,4774.35 h60
  text "PP-006" at 9856.22,4774.35 h60
  text "0.203mm" at 10715.99,4774.35 h60
  text "4.4" at 11365.83,4774.35 h60
  text "2" at 8516.57,4654.35 h60
  text "Layer 1" at 8926.48,4654.35 h60
  text "CF-004" at 9856.22,4654.35 h60
  text "0.030mm" at 10715.99,4654.35 h60
  text "Dielectric 1" at 8926.48,4534.35 h60
  text "FR-4" at 9856.22,4534.35 h60
  text "1.030mm" at 10715.99,4534.35 h60
  text "4.6" at 11365.83,4534.35 h60
  text "3" at 8516.57,4414.35 h60
  text "Layer 2" at 8926.48,4414.35 h60
  text "CF-004" at 9856.22,4414.35 h60
  text "0.030mm" at 10715.99,4414.35 h60
  text "Dielectric 3" at 8926.48,4294.35 h60
  text "PP-006" at 9856.22,4294.35 h60
  text "0.203mm" at 10715.99,4294.35 h60
  text "4.4" at 11365.83,4294.35 h60
  text "4" at 8516.57,4174.35 h60
  text "Bottom Layer" at 8926.48,4174.35 h60
  text "0.035mm" at 10715.99,4174.35 h60
  text "Bottom Solder" at 8926.48,4054.35 h60
  text "Solder Resist" at 9856.22,4054.35 h60
  text "0.020mm" at 10715.99,4054.35 h60
  text "3.5" at 11365.83,4054.35 h60
  text "Bottom Overlay" at 8926.48,3934.35 h60
  text "Total board thickness:" at 8516.57,3814.35 h60
  text "1.606mm" at 10715.99,3814.35 h60
Drill Drawing:
  drawing of 189 lines, arcs and shapes, not listed
  text "Symbol" at 144.5,9946.94 h72
  text "Count" at 650.38,9946.94 h72
  text "Hole Size" at 1250.22,9946.94 h72
  text "Plated" at 2399.88,9946.94 h72
  text "Hole Type" at 2905.76,9946.94 h72
  text "Drill Layer Pair" at 3639.56,9946.94 h72
  text "Via/Pad" at 5139.11,9946.94 h72
  text "Pad Shape" at 5728.96,9946.94 h72
  text "Template" at 6474.76,9946.94 h72
  text "Description" at 7694.4,9946.94 h72
  text "Hole Tolerance (+)" at 8548.16,9946.94 h72
  text "Hole Tolerance (-)" at 9881.77,9946.94 h72
  text "1" at 650.38,9796.94 h60
  text "98.43mil (2.500mm)" at 1250.22,9796.94 h60
  text "NPTH" at 2399.88,9796.94 h60
  text "Round" at 2905.76,9796.94 h60
  text "Top Layer - Bottom Layer" at 3639.56,9796.94 h60
  text "Pad" at 5139.11,9796.94 h60
  text "Rounded" at 5728.96,9796.94 h60
  text "c0hn250p0" at 6474.76,9796.94 h60
  text "2" at 650.38,9646.94 h60
  text "51.18mil (1.300mm)" at 1250.22,9646.94 h60
  text "PTH" at 2399.88,9646.94 h60
  text "Round" at 2905.76,9646.94 h60
  text "Top Layer - Bottom Layer" at 3639.56,9646.94 h60
  text "Pad" at 5139.11,9646.94 h60
  text "Rounded" at 5728.96,9646.94 h60
  text "(Mixed)" at 6474.76,9646.94 h60
  text "4" at 650.38,9496.94 h60
  text "23.62mil (0.600mm)" at 1250.22,9496.94 h60
  text "PTH" at 2399.88,9496.94 h60
  text "Slot" at 2905.76,9496.94 h60
  text "Top Layer - Bottom Layer" at 3639.56,9496.94 h60
  text "Pad" at 5139.11,9496.94 h60
  text "Rounded" at 5728.96,9496.94 h60
  text "r90_170h60_140r45" at 6474.76,9496.94 h60
  text "4" at 650.38,9346.94 h60
  text "23.62mil (0.600mm)" at 1250.22,9346.94 h60
  text "PTH" at 2399.88,9346.94 h60
  text "Slot" at 2905.76,9346.94 h60
  text "Top Layer - Bottom Layer" at 3639.56,9346.94 h60
  text "Pad" at 5139.11,9346.94 h60
  text "Rounded" at 5728.96,9346.94 h60
  text "(Mixed)" at 6474.76,9346.94 h60
  text "4" at 650.38,9196.94 h60
  text "24.41mil (0.620mm)" at 1250.22,9196.94 h60
  text "NPTH" at 2399.88,9196.94 h60
  text "Round" at 2905.76,9196.94 h60
  text "Top Layer - Bottom Layer" at 3639.56,9196.94 h60
  text "Pad" at 5139.11,9196.94 h60
  text "Rounded" at 5728.96,9196.94 h60
  text "c0hn62" at 6474.76,9196.94 h60
  text "4" at 650.38,9046.94 h60
  text "41.73mil (1.060mm)" at 1250.22,9046.94 h60
  text "PTH" at 2399.88,9046.94 h60
  text "Round" at 2905.76,9046.94 h60
  text "Top Layer - Bottom Layer" at 3639.56,9046.94 h60
  text "Pad" at 5139.11,9046.94 h60
  text "(Mixed)" at 5728.96,9046.94 h60
  text "(Mixed)" at 6474.76,9046.94 h60
  text "4" at 650.38,8896.94 h60
  text "61.81mil (1.570mm)" at 1250.22,8896.94 h60
  text "PTH" at 2399.88,8896.94 h60
  text "Round" at 2905.76,8896.94 h60
  text "Top Layer - Bottom Layer" at 3639.56,8896.94 h60
  text "Pad" at 5139.11,8896.94 h60
  text "Rounded" at 5728.96,8896.94 h60
  text "c220h157m230mx230p0" at 6474.76,8896.94 h60
  text "F" at 115.41,8886.95 h66.67
  text "4" at 650.38,8746.94 h60
  text "64.17mil (1.630mm)" at 1250.22,8746.94 h60
  text "PTH" at 2399.88,8746.94 h60
  text "Round" at 2905.76,8746.94 h60
  text "Top Layer - Bottom Layer" at 3639.56,8746.94 h60
  text "Pad" at 5139.11,8746.94 h60
  text "Rounded" at 5728.96,8746.94 h60
  text "c244h163" at 6474.76,8746.94 h60
  text "4" at 650.38,8596.94 h60
  text "74.80mil (1.900mm)" at 1250.22,8596.94 h60
  text "PTH" at 2399.88,8596.94 h60
  text "Round" at 2905.76,8596.94 h60
  text "Top Layer - Bottom Layer" at 3639.56,8596.94 h60
  text "Pad" at 5139.11,8596.94 h60
  text "Rounded" at 5728.96,8596.94 h60
  text "c290h190m300mx300p0" at 6474.76,8596.94 h60
  text "A" at 115.41,8586.95 h66.67
  text "4" at 650.38,8446.94 h60
  text "122.05mil (3.100mm)" at 1250.22,8446.94 h60
  text "PTH" at 2399.88,8446.94 h60
  text "Round" at 2905.76,8446.94 h60
  text "Top Layer - Bottom Layer" at 3639.56,8446.94 h60
  text "Pad" at 5139.11,8446.94 h60
  text "Rounded" at 5728.96,8446.94 h60
  text "c500h310" at 6474.76,8446.94 h60
  text "E" at 115.41,8436.95 h66.67
  text "4" at 650.38,8296.94 h60
  text "127.95mil (3.250mm)" at 1250.22,8296.94 h60
  text "NPTH" at 2399.88,8296.94 h60
  text "Round" at 2905.76,8296.94 h60
  text "Top Layer - Bottom Layer" at 3639.56,8296.94 h60
  text "Pad" at 5139.11,8296.94 h60
  text "Rounded" at 5728.96,8296.94 h60
  text "c0hn325p0" at 6474.76,8296.94 h60
  text "C" at 115.41,8286.95 h66.67
  text "8" at 650.38,8146.94 h60
  text "40.16mil (1.020mm)" at 1250.22,8146.94 h60
  text "PTH" at 2399.88,8146.94 h60
  text "Round" at 2905.76,8146.94 h60
  text "Top Layer - Bottom Layer" at 3639.56,8146.94 h60
  text "Pad" at 5139.11,8146.94 h60
  text "Rounded" at 5728.96,8146.94 h60
  text "c153h102" at 6474.76,8146.94 h60
  text "8" at 650.38,7996.94 h60
  text "59.06mil (1.500mm)" at 1250.22,7996.94 h60
  text "PTH" at 2399.88,7996.94 h60
  text "Round" at 2905.76,7996.94 h60
  text "Top Layer - Bottom Layer" at 3639.56,7996.94 h60
  text "Pad" at 5139.11,7996.94 h60
  text "(Mixed)" at 5728.96,7996.94 h60
  text "(Mixed)" at 6474.76,7996.94 h60
  text "8" at 650.38,7846.94 h60
  text "127.95mil (3.250mm)" at 1250.22,7846.94 h60
  text "NPTH" at 2399.88,7846.94 h60
  text "Round" at 2905.76,7846.94 h60
  text "Top Layer - Bottom Layer" at 3639.56,7846.94 h60
  text "Pad" at 5139.11,7846.94 h60
  text "Rounded" at 5728.96,7846.94 h60
  text "(Mixed)" at 6474.76,7846.94 h60
  text "9" at 650.38,7696.94 h60
  text "37.40mil (0.950mm)" at 1250.22,7696.94 h60
  text "PTH" at 2399.88,7696.94 h60
  text "Round" at 2905.76,7696.94 h60
  text "Top Layer - Bottom Layer" at 3639.56,7696.94 h60
  text "Pad" at 5139.11,7696.94 h60
  text "(Mixed)" at 5728.96,7696.94 h60
  text "(Mixed)" at 6474.76,7696.94 h60
  text "12" at 650.38,7546.94 h60
  text "39.37mil (1.000mm)" at 1250.22,7546.94 h60
  text "PTH" at 2399.88,7546.94 h60
  text "Round" at 2905.76,7546.94 h60
  text "Top Layer - Bottom Layer" at 3639.56,7546.94 h60
  text "Pad" at 5139.11,7546.94 h60
  text "(Mixed)" at 5728.96,7546.94 h60
  text "(Mixed)" at 6474.76,7546.94 h60
  text "15" at 650.38,7396.94 h60
  text "62.99mil (1.600mm)" at 1250.22,7396.94 h60
  text "PTH" at 2399.88,7396.94 h60
  text "Round" at 2905.76,7396.94 h60
  text "Top Layer - Bottom Layer" at 3639.56,7396.94 h60
  text "Pad" at 5139.11,7396.94 h60
  text "Rounded" at 5728.96,7396.94 h60
  text "c300h160m310mx310p0" at 6474.76,7396.94 h60
  text "16" at 650.38,7246.94 h60
  text "35.04mil (0.890mm)" at 1250.22,7246.94 h60
  text "PTH" at 2399.88,7246.94 h60
  text "Round" at 2905.76,7246.94 h60
  text "Top Layer - Bottom Layer" at 3639.56,7246.94 h60
  text "Pad" at 5139.11,7246.94 h60
  text "(Mixed)" at 5728.96,7246.94 h60
  text "(Mixed)" at 6474.76,7246.94 h60
  text "17" at 650.38,7096.94 h60
  text "35.43mil (0.900mm)" at 1250.22,7096.94 h60
  text "PTH" at 2399.88,7096.94 h60
  text "Round" at 2905.76,7096.94 h60
  text "Top Layer - Bottom Layer" at 3639.56,7096.94 h60
  text "Pad" at 5139.11,7096.94 h60
  text "(Mixed)" at 5728.96,7096.94 h60
  text "(Mixed)" at 6474.76,7096.94 h60
  text "48" at 650.38,6946.94 h60
  text "35.43mil (0.900mm)" at 1250.22,6946.94 h60
  text "PTH" at 2399.88,6946.94 h60
  text "Round" at 2905.76,6946.94 h60
  text "Top Layer - Bottom Layer" at 3639.56,6946.94 h60
  text "Pad" at 5139.11,6946.94 h60
  text "(Mixed)" at 5728.96,6946.94 h60
  text "(Mixed)" at 6474.76,6946.94 h60
  text "B" at 115.41,6936.95 h66.67
  text "599" at 650.38,6796.94 h60
  text "11.81mil (0.300mm)" at 1250.22,6796.94 h60
  text "PTH" at 2399.88,6796.94 h60
  text "Round" at 2905.76,6796.94 h60
  text "Top Layer - Bottom Layer" at 3639.56,6796.94 h60
  text "(Mixed)" at 5139.11,6796.94 h60
  text "Rounded" at 5728.96,6796.94 h60
  text "(Mixed)" at 6474.76,6796.94 h60
  text "D" at 115.41,6786.95 h66.67
  text "779 Total" at 650.38,6646.94 h60
  text "Slot definitions :" at 144.5,6501.97 h60
  text "Routed Path Length" at 1177.19,6501.97 h60
  text "= Calculated from tool start centre position to tool end centre position." at 2279.86,6501.97 h60
  text "Hole Length" at 1177.19,6401.99 h60
  text "= Routed Path Length + Tool Size = Slot length as defined in the PCB layout" at 1869.99,6401.99 h60

## Dimensions
7874.02,5118.11 to 7874.02,0 on Board Outline
0,5118.11 to 7874.02,5118.11 on Board Outline

## Text inside footprints (layer, text, board x,y; h text height)
J1: Mechanical 13 "PCB Edge" at 2959.15,22.34 h31.5
J7: Mechanical 13 "PCB Edge" at 7851.66,2125.09 h31.5 r90
J8: Top Overlay "PCB Edge" at 5769.73,30 h39.37
J14: Top Overlay "1" at 87.35,2550.83 h31.5 r90
J16: Top Overlay "PCB Edge" at 6724.81,32.04 h39.37
J18: Top Overlay "1" at 3947.44,4825.73 h39.37 r180
J22: Top Overlay "1" at 3104.44,4825.73 h39.37 r180
J24: Top Overlay "1" at 2102.47,1495.69 h30 r90
SW7: Top Overlay "ON" at 2568.41,3250.95 h30; Top Overlay "1" at 2600.41,3099.66 h35.43 r180; Top Overlay "2" at 2699.41,3100.66 h35.43 r180; Top Overlay "3" at 2797.41,3101.66 h35.43 r180
SW10: Top Overlay "ON" at 7232.51,4724.74 h19.47 r90; Top Overlay "ON" at 7032.51,4724.74 h19.47 r90; Top Overlay "ON" at 6932.51,4724.74 h19.47 r90; Top Overlay "ON" at 6832.51,4724.74 h19.47 r90; Top Overlay "ON" at 6732.51,4724.74 h19.47 r90; Top Overlay "ON" at 6632.51,4724.74 h19.47 r90; Top Overlay "ON" at 7132.51,4724.74 h19.47 r90